# Altium PCB PB-PCB1.PcbDoc (part 1 of 4)
Units mm, origin at the board's own origin, x right, y up, seen from the top; angles counter-clockwise.
Board outline 179 x 85 mm, 2 copper layers (Top Layer, Bottom Layer); 468 components, 249 nets, 1291 pads, 562 vias.
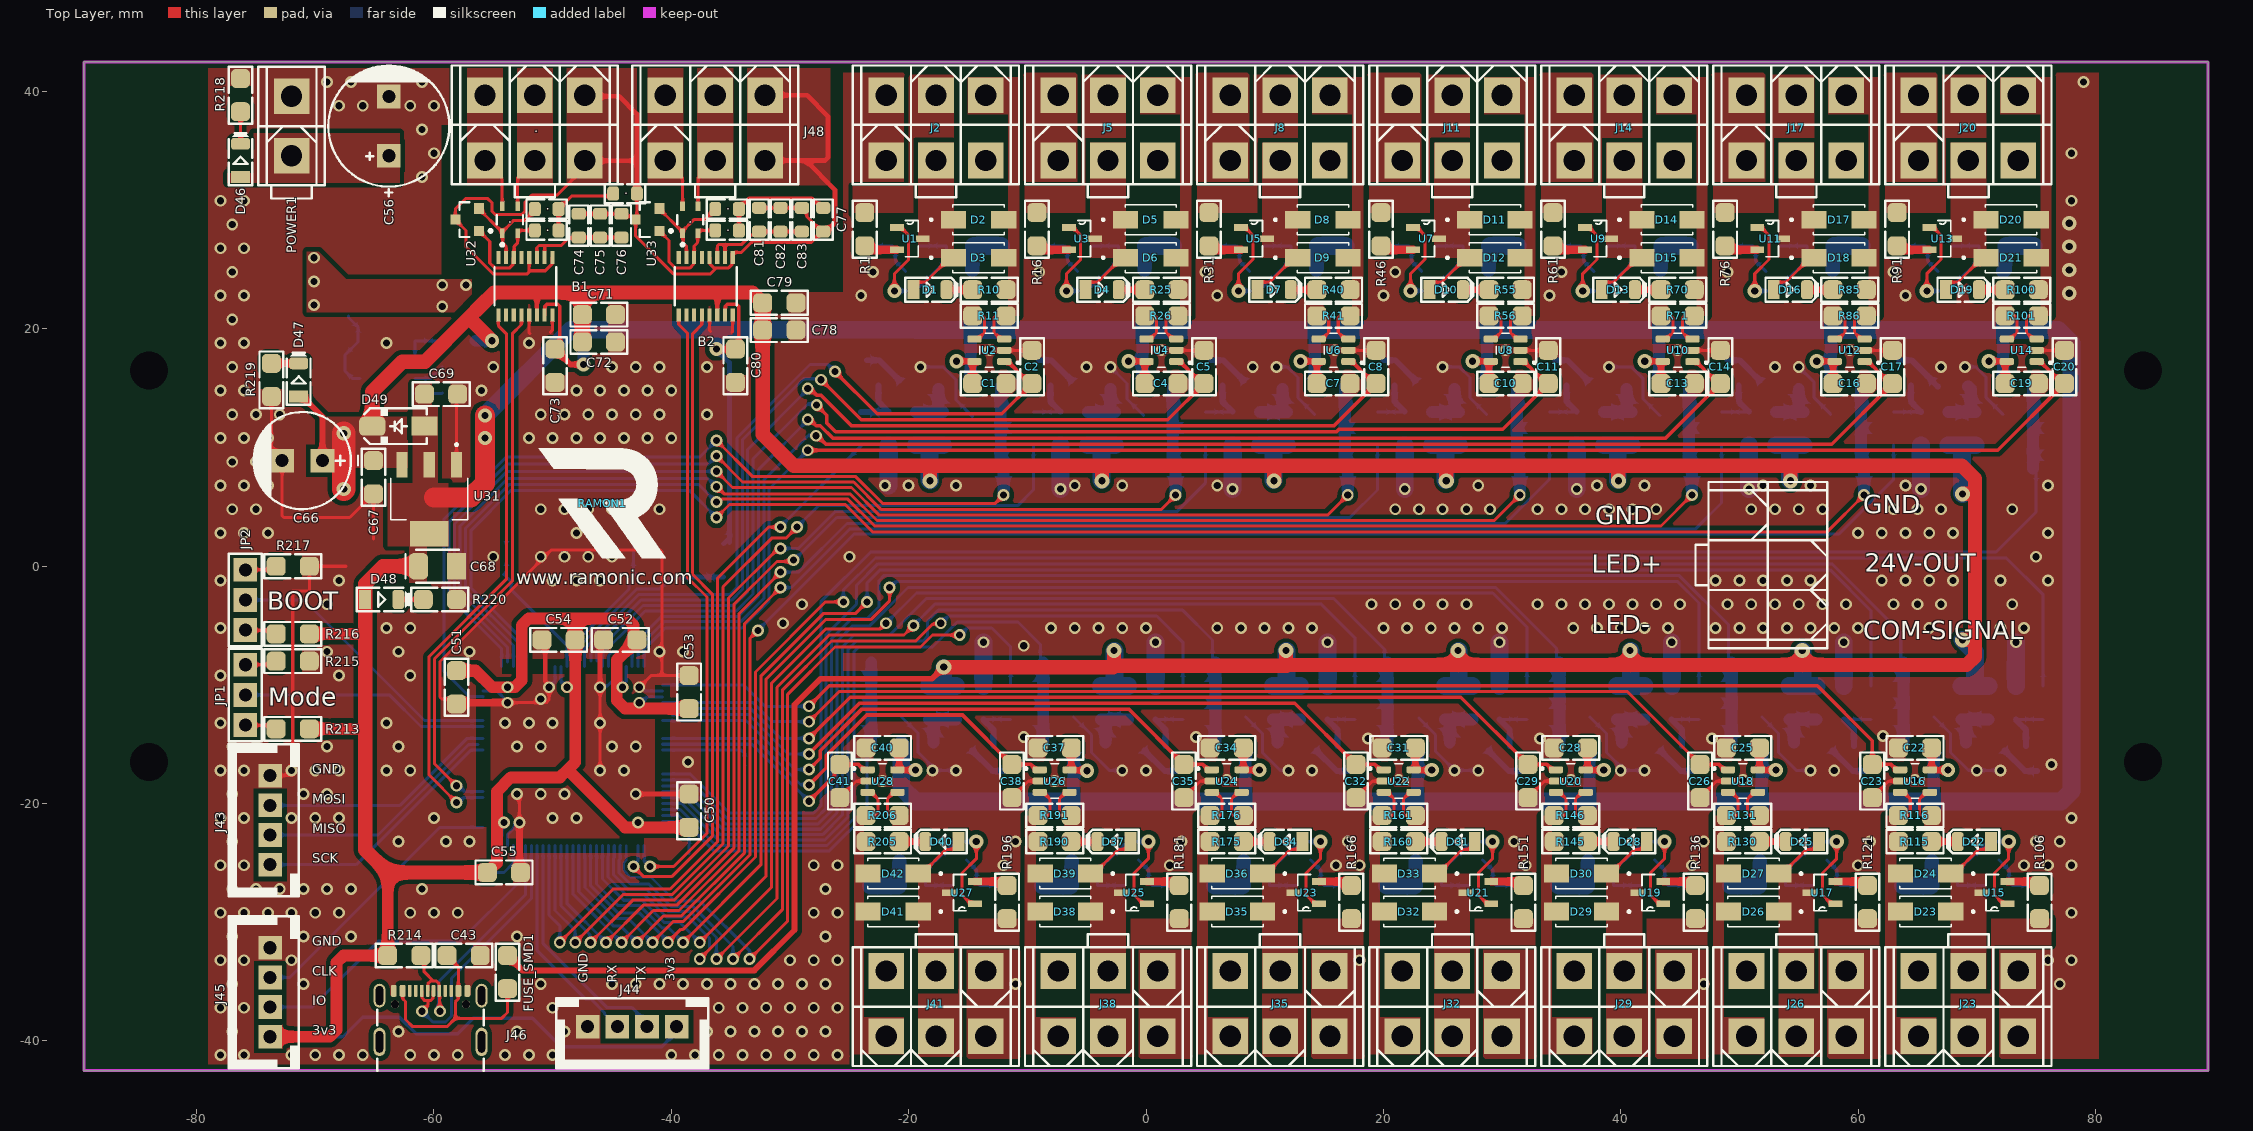
[diagram p0: Top Layer view]
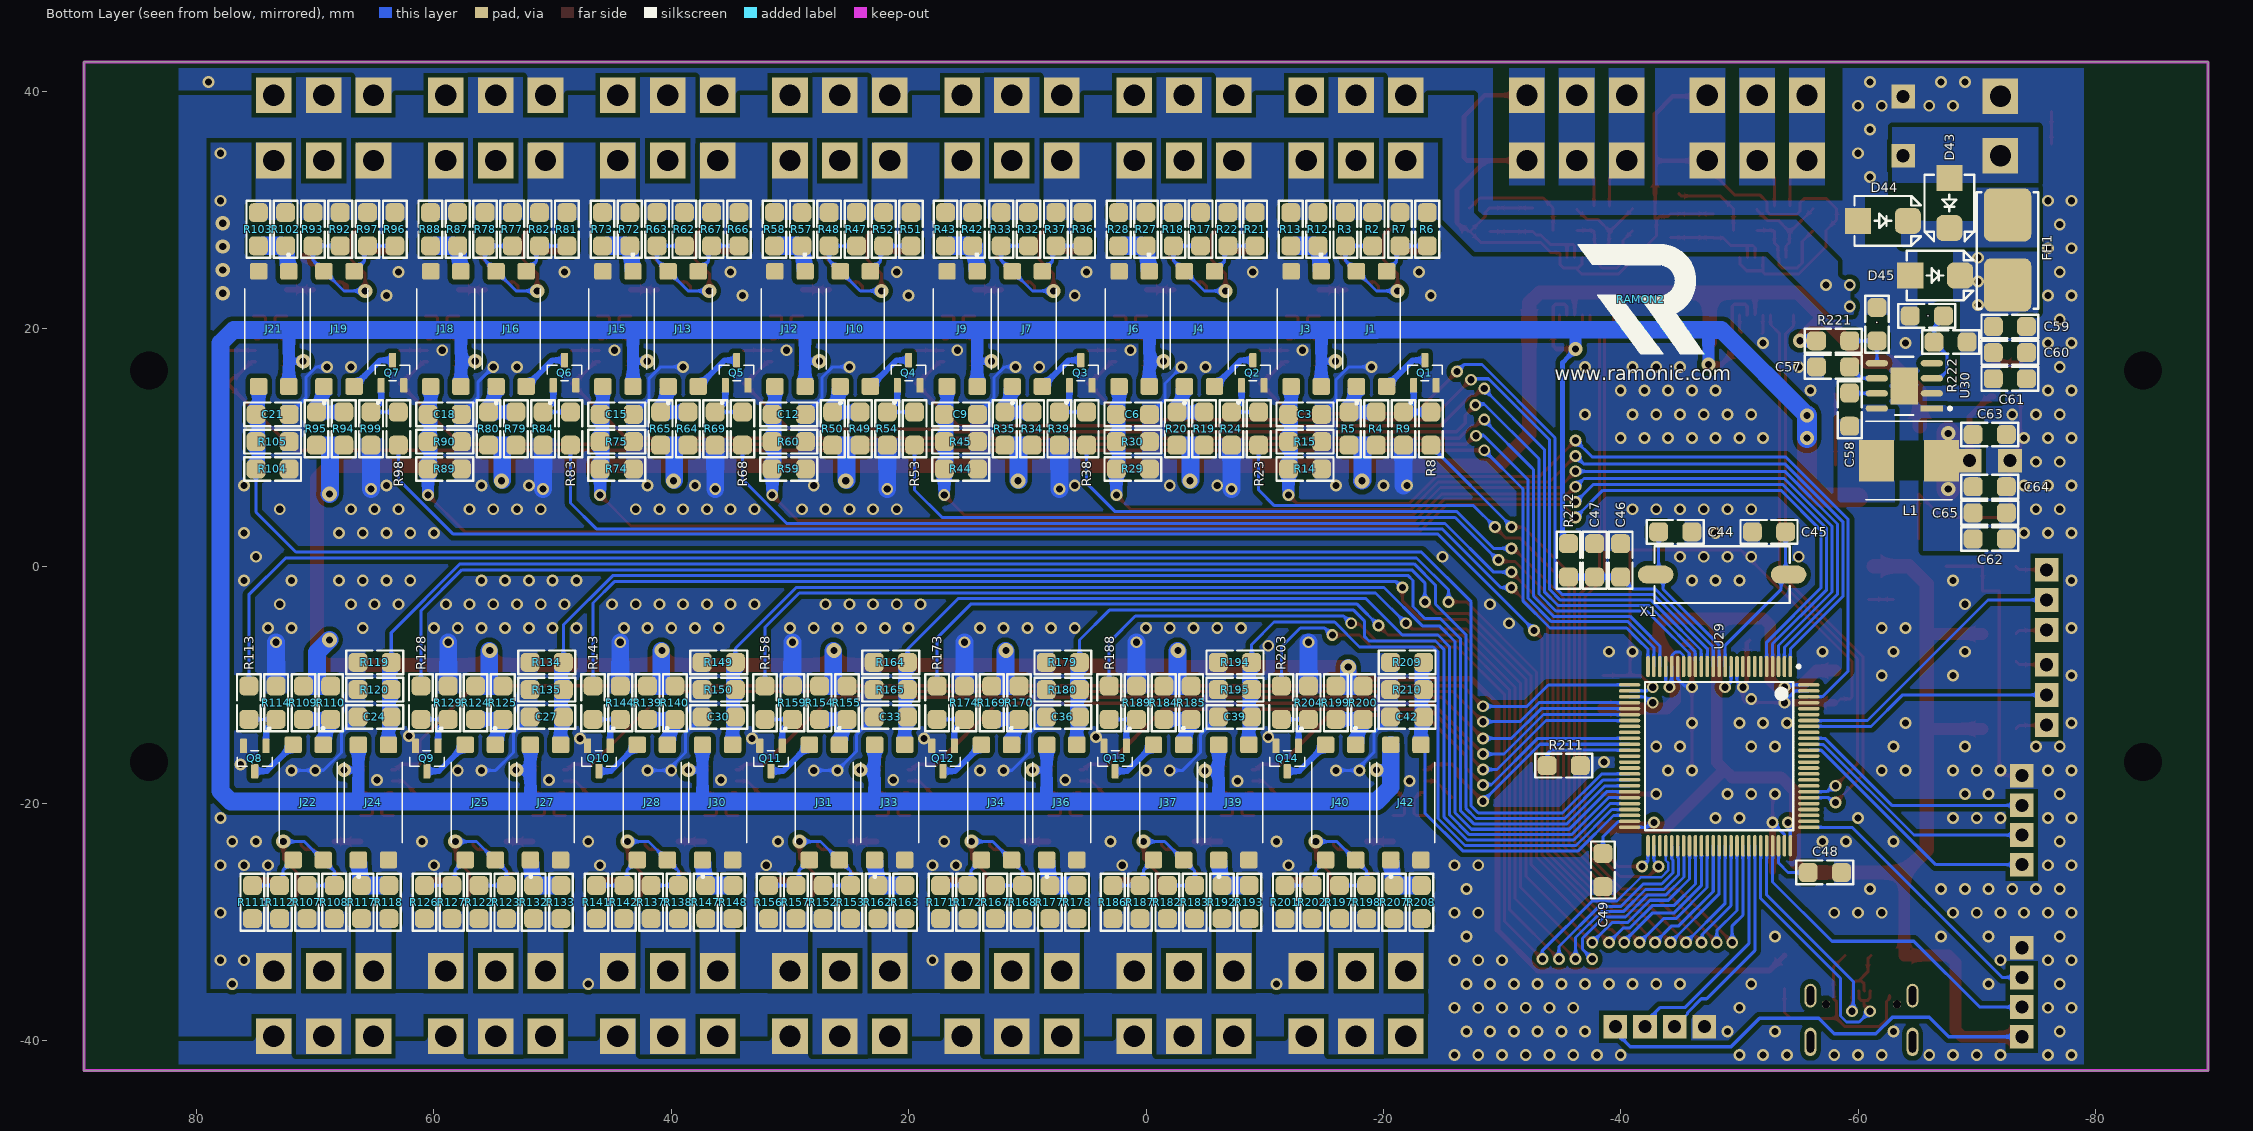
[diagram p1: Bottom Layer view, seen from below]
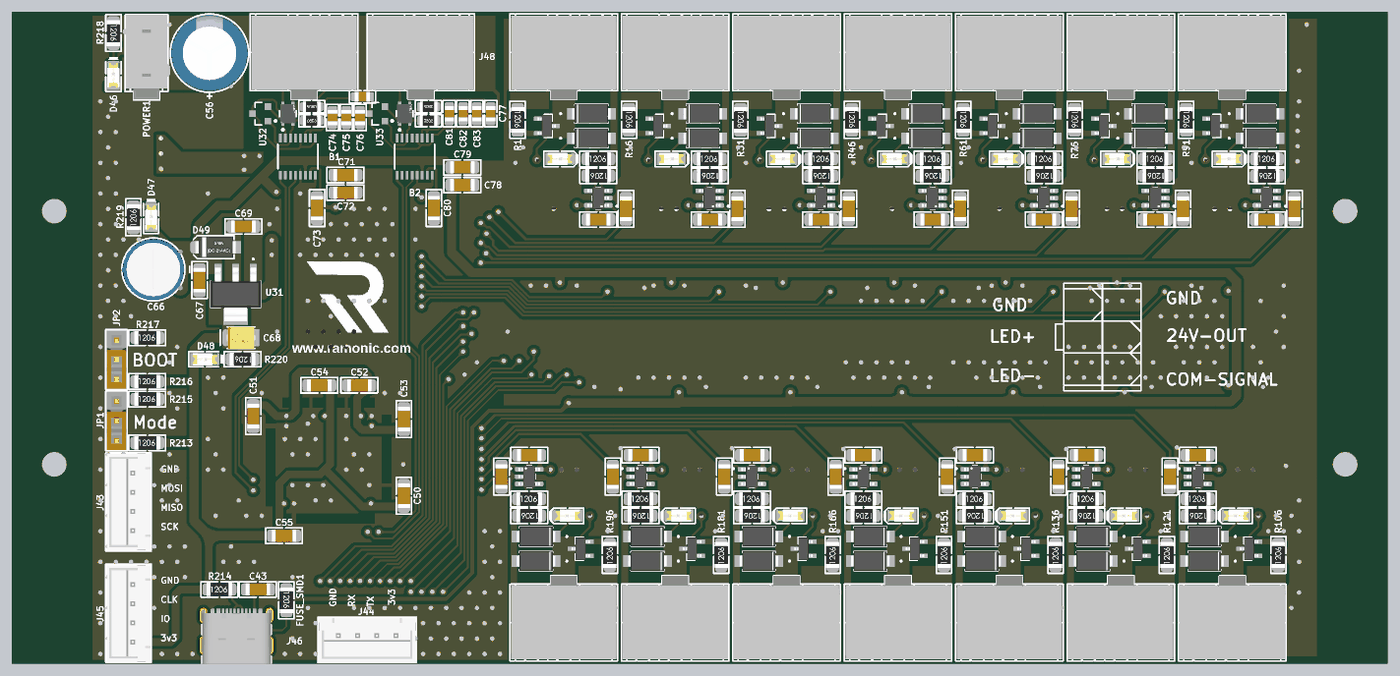
[diagram p4: 3D render of the assembled board from above, using the file's embedded part models]
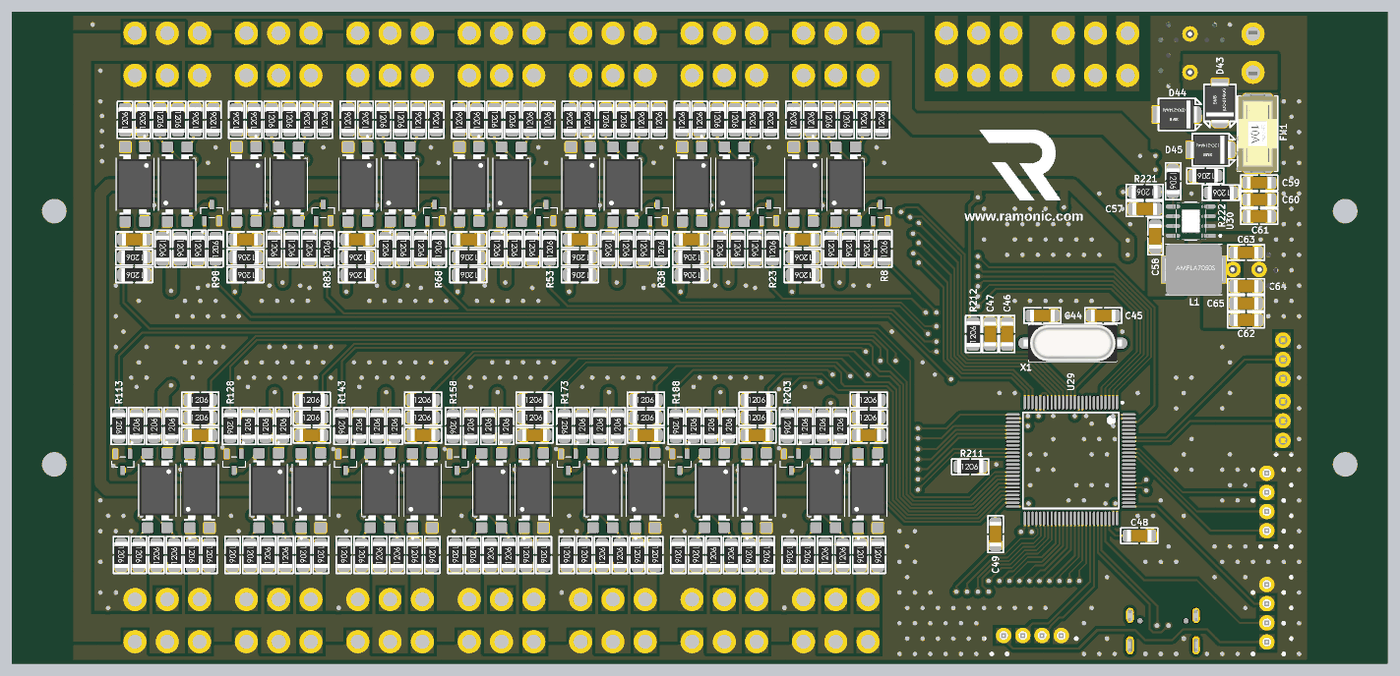
[diagram p5: 3D render of the assembled board from below, using the file's embedded part models]

## Layer stack, top to bottom
Top Solder: solder mask 0.0102, Solder Resist, Dk 3.5
Top Layer: signal copper 0.0356
Dielectric 1: dielectric 0.32, FR-4, Dk 4.8
Bottom Layer: signal copper 0.0356
Bottom Solder: solder mask 0.0102, Solder Resist, Dk 3.5

## Board outline
-89.5,-42.5 -89.5,42.5 89.5,42.5 89.5,-42.5

## Design rules (kind name [scope] priority, off if disabled: settings)
AcuteAngle [All] p1: minimum=7.50000000000000E+0001 checktracksonly=FALSE
BoardOutlineClearance [All] p1: gap=0.4 ignorepadtopadclearanceinfootprint=FALSE
Clearance [All] p1: gap=0.2 ignorepadtopadclearanceinfootprint=FALSE except(0.3: Arc-THPad Arc-Hole Track-THPad Track-Hole SMDPad-THPad SMDPad-Hole THPad-THPad THPad-Via THPad-Fill THPad-Region THPad-Hole Via-Via Via-Fill Via-Region Via-Hole Fill-Hole Region-Hole; 0.4: Arc-Poly Track-Poly SMDPad-Poly THPad-Poly Via-Poly Fill-Poly Poly-Poly Poly-Region Poly-Text Poly-Hole)
FanoutControl Fanout_Default [All] p1: bgadir=Out bgaviamode=Centered fanoutstyle=Auto fanoutdirection=Alternating viagrid=0.025 // Fanout_Default (Default Rule)
FanoutControl Fanout_Small [(CompPinCount < 5)] p2: bgadir=Out bgaviamode=Centered fanoutstyle=Auto fanoutdirection=OutThenIn viagrid=0.025 // Fanout_Small (Default Rule)
FanoutControl Fanout_LCC [IsLCC] p4: bgadir=Out bgaviamode=Centered fanoutstyle=Auto fanoutdirection=Alternating viagrid=0.025 // Fanout_LCC (Default Rule)
FanoutControl Fanout_BGA [IsBGA] p5: bgadir=Out bgaviamode=Centered fanoutstyle=Auto fanoutdirection=Alternating viagrid=0.025 // Fanout_BGA (Default Rule)
HoleSize [All] p1: absolutevalues=TRUE maxlimit=50 minlimit=0.4 maxpercent=80.000 minpercent=20.000
HoleToHoleClearance [All] p1: gap=0.3 allowstackedmicrovias=TRUE
MinimumAnnularRing [All] p1: minimumring=0.2
MinimumSolderMaskSliver [All] p1: minsoldermaskwidth=0.2
PolygonConnect [All] p1: connectstyle=Direct reliefconductorwidth=0.254 reliefentries=4 polygonreliefangle="90 Angle" airgapwidth=0.254
RoutingVias [All] p1: holewidth=0.5 width=0.9 viastyle="Through Hole" minholewidth=0.4 minwidth=0.8 maxholewidth=2 maxwidth=3
SilkToSolderMaskClearance [IsPad] p1: minsilkscreentomaskgap=0.2 clearancetoexposedcopper=TRUE
SolderMaskExpansion [All] p1: expansion=0.102 istentingtop=FALSE
SupplyNets "Schematic Supply Nets_1" [InNet('MGND')] p1: voltage=0.000
SupplyNets "Schematic Supply Nets" [InNet('MCUGND')] p2: voltage=0.000
Width [All] p1: maxlimit=10 minlimit=0.2 preferedwidth=0.254
22 further rules are at their usual default settings.

## Classes and differential pairs
component class CAN: . B1 B2 C71 C72 C73 C74 C75 C76 C77 C78 C79 C80 C81 C82 C83 J48 U32 U33
component class power: . C56 C57 C58 C59 C60 C61 C62 C63 C64 C65 C66 C67 C68 C69 D43 D44 D45 D46 D47 D48 D49 FH1 L1 POWER1 R218 R219 R220 R221 R222 U30 U31
component class MCU: C43 C44 C45 C46 C47 C48 C49 C50 C51 C52 C53 C54 C55 FUSE_SMD1 J43 J44 J45 J46 JP1 JP2 R211 R212 R213 R214 R215 R216 R217 RAMON1 RAMON2 U29 X1
component class push-button-switch-14: C40 C41 C42 D40 D41 D42 J40 J41 J42 Q14 R196 R197 R198 R199 R200 R201 R202 R203 R204 R205 R206 R207 R208 R209 R210 U27 U28
component class push-button-switch-13: C37 C38 C39 D37 D38 D39 J37 J38 J39 Q13 R181 R182 R183 R184 R185 R186 R187 R188 R189 R190 R191 R192 R193 R194 R195 U25 U26
component class push-button-switch-12: C34 C35 C36 D34 D35 D36 J34 J35 J36 Q12 R166 R167 R168 R169 R170 R171 R172 R173 R174 R175 R176 R177 R178 R179 R180 U23 U24
component class push-button-switch-11: C31 C32 C33 D31 D32 D33 J31 J32 J33 Q11 R151 R152 R153 R154 R155 R156 R157 R158 R159 R160 R161 R162 R163 R164 R165 U21 U22
component class push-button-switch-10: C28 C29 C30 D28 D29 D30 J28 J29 J30 Q10 R136 R137 R138 R139 R140 R141 R142 R143 R144 R145 R146 R147 R148 R149 R150 U19 U20
component class push-button-switch-9: C25 C26 C27 D25 D26 D27 J25 J26 J27 Q9 R121 R122 R123 R124 R125 R126 R127 R128 R129 R130 R131 R132 R133 R134 R135 U17 U18
component class push-button-switch-8: C22 C23 C24 D22 D23 D24 J22 J23 J24 Q8 R106 R107 R108 R109 R110 R111 R112 R113 R114 R115 R116 R117 R118 R119 R120 U15 U16
component class push-button-switch-7: C19 C20 C21 D19 D20 D21 J19 J20 J21 Q7 R91 R92 R93 R94 R95 R96 R97 R98 R99 R100 R101 R102 R103 R104 R105 U13 U14
component class push-button-switch-6: C16 C17 C18 D16 D17 D18 J16 J17 J18 Q6 R76 R77 R78 R79 R80 R81 R82 R83 R84 R85 R86 R87 R88 R89 R90 U11 U12
component class push-button-switch-5: C13 C14 C15 D13 D14 D15 J13 J14 J15 Q5 R61 R62 R63 R64 R65 R66 R67 R68 R69 R70 R71 R72 R73 R74 R75 U9 U10
component class push-button-switch-4: C10 C11 C12 D10 D11 D12 J10 J11 J12 Q4 R46 R47 R48 R49 R50 R51 R52 R53 R54 R55 R56 R57 R58 R59 R60 U7 U8
component class push-button-switch-3: C7 C8 C9 D7 D8 D9 J7 J8 J9 Q3 R31 R32 R33 R34 R35 R36 R37 R38 R39 R40 R41 R42 R43 R44 R45 U5 U6
component class push-button-switch-2: C4 C5 C6 D4 D5 D6 J4 J5 J6 Q2 R16 R17 R18 R19 R20 R21 R22 R23 R24 R25 R26 R27 R28 R29 R30 U3 U4
component class push-button-switch-1: C1 C2 C3 D1 D2 D3 J1 J2 J3 Q1 R1 R2 R3 R4 R5 R6 R7 R8 R9 R10 R11 R12 R13 R14 R15 U1 U2

## Components (designator, comment, footprint, x,y, rotation, side; value= is the part's Value field where it differs from the comment)
. "CONN_ATXPWR_6" ATXPWR_6 -51.5,37.191 r0 top (schematic designator J47)
. "ACM2520-102-2P-T002" FP-ACM2520-2P-MFG -38.4,29.2 r90 top (schematic designator L3)
. "ACM2520-102-2P-T002" FP-ACM2520-2P-MFG -53.6,29.2 r90 top (schematic designator L2)
. "RES1206 60 1%" R0805 -35.3,28.3 r0 top (schematic designator R228)
. "RES1206 60 1%" R0805 -35.3,30.1 r180 top (schematic designator R227)
. "RES1206 60 1%" R0805 -50.5,28.3 r0 top (schematic designator R226)
. "RES1206 60 1%" R0805 -50.5,30.1 r180 top (schematic designator R225)
. "CAP0805 4.7nf 50V" C0805 -43.9,31.4 r0 top (schematic designator C70)
. "RES1206 24.9k 1%" R1206#1 -61.6,20.4 r270 bottom (schematic designator R223)
. "RES1206 10K 1%" R1206#1 -65.8,21.1 r0 bottom (schematic designator R224)
B1 "CA-IS2062A" CAIS2062A -52.3,23.6 r90 top
B2 "CA-IS2062A" CAIS2062A -37.1,23.6 r90 top
C1 "CAP1206 100nf 50V" C1206#1 -13.2,15.4 r180 top locked
C2 "CAP1206 100nf 50V" C1206#1 -9.6,16.8 r90 top locked
C3 "CAP1206 100nf 50V" C1206#2 -13.4,12.8 r180 bottom locked
C4 "CAP1206 100nf 50V" C1206#1 1.3,15.4 r180 top locked
C5 "CAP1206 100nf 50V" C1206#1 4.9,16.8 r90 top locked
C6 "CAP1206 100nf 50V" C1206#2 1.1,12.8 r180 bottom locked
C7 "CAP1206 100nf 50V" C1206#1 15.8,15.4 r180 top locked
C8 "CAP1206 100nf 50V" C1206#1 19.4,16.8 r90 top locked
C9 "CAP1206 100nf 50V" C1206#2 15.6,12.8 r180 bottom locked
C10 "CAP1206 100nf 50V" C1206#1 30.3,15.4 r180 top locked
C11 "CAP1206 100nf 50V" C1206#1 33.9,16.8 r90 top locked
C12 "CAP1206 100nf 50V" C1206#2 30.1,12.8 r180 bottom locked
C13 "CAP1206 100nf 50V" C1206#1 44.8,15.4 r180 top locked
C14 "CAP1206 100nf 50V" C1206#1 48.4,16.8 r90 top locked
C15 "CAP1206 100nf 50V" C1206#2 44.6,12.8 r180 bottom locked
C16 "CAP1206 100nf 50V" C1206#1 59.3,15.4 r180 top locked
C17 "CAP1206 100nf 50V" C1206#1 62.9,16.8 r90 top locked
C18 "CAP1206 100nf 50V" C1206#2 59.1,12.8 r180 bottom locked
C19 "CAP1206 100nf 50V" C1206#1 73.8,15.4 r180 top locked
C20 "CAP1206 100nf 50V" C1206#1 77.4,16.8 r90 top locked
C21 "CAP1206 100nf 50V" C1206#2 73.6,12.8 r180 bottom locked
C22 "CAP1206 100nf 50V" C1206#1 64.8,-15.3 r0 top locked
C23 "CAP1206 100nf 50V" C1206#1 61.2,-18.1 r270 top locked
C24 "CAP1206 100nf 50V" C1206#2 65,-12.7 r0 bottom locked
C25 "CAP1206 100nf 50V" C1206#1 50.3,-15.3 r0 top locked
C26 "CAP1206 100nf 50V" C1206#1 46.7,-18.1 r270 top locked
C27 "CAP1206 100nf 50V" C1206#2 50.5,-12.7 r0 bottom locked
C28 "CAP1206 100nf 50V" C1206#1 35.8,-15.3 r0 top locked
C29 "CAP1206 100nf 50V" C1206#1 32.2,-18.1 r270 top locked
C30 "CAP1206 100nf 50V" C1206#2 36,-12.7 r0 bottom locked
C31 "CAP1206 100nf 50V" C1206#1 21.3,-15.3 r0 top locked
C32 "CAP1206 100nf 50V" C1206#1 17.7,-18.1 r270 top locked
C33 "CAP1206 100nf 50V" C1206#2 21.5,-12.7 r0 bottom locked
C34 "CAP1206 100nf 50V" C1206#1 6.8,-15.3 r0 top locked
C35 "CAP1206 100nf 50V" C1206#1 3.2,-18.1 r270 top locked
C36 "CAP1206 100nf 50V" C1206#2 7,-12.7 r0 bottom locked
C37 "CAP1206 100nf 50V" C1206#1 -7.7,-15.3 r0 top locked
C38 "CAP1206 100nf 50V" C1206#1 -11.3,-18.1 r270 top locked
C39 "CAP1206 100nf 50V" C1206#2 -7.5,-12.7 r0 bottom locked
C40 "CAP1206 100nf 50V" C1206#1 -22.2,-15.3 r0 top locked
C41 "CAP1206 100nf 50V" C1206#1 -25.8,-18.1 r270 top locked
C42 "CAP1206 100nf 50V" C1206#2 -22,-12.7 r0 bottom
C43 "CAP1206 100nf 50V" C1206#1 -57.5,-32.8 r180 top locked
C44 "CAP1206 22pf 50V" C1206#2 -44.6,2.9 r0 bottom locked
C45 "CAP1206 22pf 50V" C1206#2 -52.5,2.9 r180 bottom locked
C46 "CAP1206 1uf 50V" C1206#2 -40,0.5 r270 bottom
C47 "CAP1206 100nf 50V" C1206#2 -37.8,0.5 r270 bottom
C48 "CAP1206 2.2uf 50V" C1206#2 -57.2,-25.8 r0 bottom locked
C49 "CAP1206 2.2uf 50V" C1206#2 -38.5,-25.6 r90 bottom locked
C50 "CAP1206 100nf 50V" C1206#1 -38.5,-20.6 r270 top locked
C51 "CAP1206 100nf 50V" C1206#1 -58.1,-10.2 r90 top locked
C52 "CAP1206 100nf 50V" C1206#1 -44.3,-6.2 r0 top locked
C53 "CAP1206 100nf 50V" C1206#1 -38.5,-10.6 r270 top locked
C54 "CAP1206 100nf 50V" C1206#1 -49.5,-6.2 r0 top locked
C55 "CAP1206 100nf 50V" C1206#1 -54.1,-25.8 r180 top locked
C56 "HT1V477M1012PC" C_EL_10X16 -63.8,37.091 r90 top value=470uF
C57 "CAP1206 1uf 50V" C1206#2 -57.9,16.8 r0 bottom
C58 "CAP1206 100nf 50V" C1206#2 -59.3,13.2 r270 bottom
C59 "CAP1206 10uf 50V" C1206#2 -72.8,20.2 r180 bottom
C60 "CAP1206 10uf 50V" C1206#2 -72.8,18 r180 bottom
C61 "CAP1206 220nf 50V" C1206#2 -72.8,15.8 r180 bottom
C62 "CAP1206 10uf 50V" C1206#2 -71.1,2.3 r180 bottom
C63 "CAP1206 10uf 50V" C1206#2 -71.1,11.1 r180 bottom
C64 "CAP1206 10uf 50V" C1206#2 -71.1,6.7 r180 bottom
C65 "CAP1206 10uf 50V" C1206#2 -71.1,4.5 r180 bottom
C66 "100uF" C_EL_8X12 -71.1,8.9 r180 top
C67 "CAP1206 1uf 50V" C1206#1 -65.1,7.5 r270 top
C68 "47uF" C_TN_3528 -59.7,0 r0 top
C69 "CAP1206 2.2uf 50V" C1206#1 -59.4,14.5 r0 top
C71 "CAP1206 10uf 50V" C1206#1 -46.1,21.2 r180 top
C72 "CAP1206 100nf 50V" C1206#1 -46.1,18.9 r180 top
C73 "CAP1206 100nf 50V" C1206#1 -49.8,16.9 r270 top
C74 "CAP0805 100nf 50V" C0805 -47.8,28.7 r270 top
C75 "CAP0805 100nf 50V" C0805 -46,28.7 r270 top
C76 "CAP0805 100nf 50V" C0805 -44.2,28.7 r270 top
C77 "CAP0805 4.7nf 50V" C0805 -27.2,29.2 r270 top
C78 "CAP1206 10uf 50V" C1206#1 -30.9,19.9 r180 top
C79 "CAP1206 100nf 50V" C1206#1 -30.9,22.2 r180 top
C80 "CAP1206 100nf 50V" C1206#1 -34.6,16.9 r270 top
C81 "CAP0805 100nf 50V" C0805 -32.6,29.2 r270 top
C82 "CAP0805 100nf 50V" C0805 -30.8,29.2 r270 top
C83 "CAP0805 100nf 50V" C0805 -29,29.2 r270 top
D1 "LED1206GRN" LED1206GRN#1 -18.2,23.3 r0 top locked
D2 "SS16" DIOM4325X250N -14.1,29.2 r0 top locked
D3 "SS16" DIOM4325X250N -14.1,26 r0 top locked
D4 "LED1206GRN" LED1206GRN#1 -3.7,23.3 r0 top locked
D5 "SS16" DIOM4325X250N 0.4,29.2 r0 top locked
D6 "SS16" DIOM4325X250N 0.4,26 r0 top locked
D7 "LED1206GRN" LED1206GRN#1 10.8,23.3 r0 top locked
D8 "SS16" DIOM4325X250N 14.9,29.2 r0 top locked
D9 "SS16" DIOM4325X250N 14.9,26 r0 top locked
D10 "LED1206GRN" LED1206GRN#1 25.3,23.3 r0 top locked
D11 "SS16" DIOM4325X250N 29.4,29.2 r0 top locked
D12 "SS16" DIOM4325X250N 29.4,26 r0 top locked
D13 "LED1206GRN" LED1206GRN#1 39.8,23.3 r0 top locked
D14 "SS16" DIOM4325X250N 43.9,29.2 r0 top locked
D15 "SS16" DIOM4325X250N 43.9,26 r0 top locked
D16 "LED1206GRN" LED1206GRN#1 54.3,23.3 r0 top locked
D17 "SS16" DIOM4325X250N 58.4,29.2 r0 top locked
D18 "SS16" DIOM4325X250N 58.4,26 r0 top locked
D19 "LED1206GRN" LED1206GRN#2 68.8,23.3 r0 top locked
D20 "SS16" DIOM4325X250N 72.9,29.2 r0 top locked
D21 "SS16" DIOM4325X250N 72.9,26 r0 top locked
D22 "LED1206GRN" LED1206GRN#1 69.8,-23.2 r180 top locked
D23 "SS16" DIOM4325X250N 65.7,-29.1 r180 top locked
D24 "SS16" DIOM4325X250N 65.7,-25.9 r180 top locked
D25 "LED1206GRN" LED1206GRN#1 55.3,-23.2 r180 top locked
D26 "SS16" DIOM4325X250N 51.2,-29.1 r180 top locked
D27 "SS16" DIOM4325X250N 51.2,-25.9 r180 top locked
D28 "LED1206GRN" LED1206GRN#1 40.8,-23.2 r180 top locked
D29 "SS16" DIOM4325X250N 36.7,-29.1 r180 top locked
D30 "SS16" DIOM4325X250N 36.7,-25.9 r180 top locked
D31 "LED1206GRN" LED1206GRN#1 26.3,-23.2 r180 top locked
D32 "SS16" DIOM4325X250N 22.2,-29.1 r180 top locked
D33 "SS16" DIOM4325X250N 22.2,-25.9 r180 top locked
D34 "LED1206GRN" LED1206GRN#1 11.8,-23.2 r180 top locked
D35 "SS16" DIOM4325X250N 7.7,-29.1 r180 top locked
D36 "SS16" DIOM4325X250N 7.7,-25.9 r180 top locked
D37 "LED1206GRN" LED1206GRN#1 -2.7,-23.2 r180 top locked
D38 "SS16" DIOM4325X250N -6.8,-29.1 r180 top locked
D39 "SS16" DIOM4325X250N -6.8,-25.9 r180 top locked
D40 "LED1206GRN" LED1206GRN#1 -17.2,-23.2 r180 top locked
D41 "SS16" DIOM4325X250N -21.3,-29.1 r180 top locked
D42 "SS16" DIOM4325X250N -21.3,-25.9 r180 top locked
D43 "SS34" D_SMB -67.7,30.6 r270 bottom
D44 "SS34" D_SMB -62.1,29.1 r180 bottom
D45 "SMBJ24CA" D_SMB -66.5,24.5 r180 bottom
D46 "LED1206GRN" LED1206GRN#1 -76.3,34.2 r90 top
D47 "LED1206GRN" LED1206GRN#1 -71.4,15.7 r90 top
D48 "LED1206GRN" LED1206GRN#1 -64.4,-2.8 r0 top
D49 "ss14" D_SMA -63,11.8 r180 top
FH1 "xf-155" FH_24101812 -72.6,26.6 r270 bottom value="Fuse Holder"
FUSE_SMD1 "FUSE1206" R1206#2 -53.8,-34.2 r270 top locked
J1 "EL817S" SOIC254P1030X460-4N -19,20 r90 bottom locked
J2 "CONN_ATXPWR_6" ATXPWR_6 -17.7,37.191 r0 top locked
J3 "EL817S" SOIC254P1030X460-4N -13.5,20 r270 bottom locked
J4 "EL817S" SOIC254P1030X460-4N -4.5,20 r90 bottom locked
J5 "CONN_ATXPWR_6" ATXPWR_6 -3.2,37.191 r0 top locked
J6 "EL817S" SOIC254P1030X460-4N 1,20 r270 bottom locked
J7 "EL817S" SOIC254P1030X460-4N 10,20 r90 bottom locked
J8 "CONN_ATXPWR_6" ATXPWR_6 11.3,37.191 r0 top locked
J9 "EL817S" SOIC254P1030X460-4N 15.5,20 r270 bottom locked
J10 "EL817S" SOIC254P1030X460-4N 24.5,20 r90 bottom locked
J11 "CONN_ATXPWR_6" ATXPWR_6 25.8,37.191 r0 top locked
J12 "EL817S" SOIC254P1030X460-4N 30,20 r270 bottom locked
J13 "EL817S" SOIC254P1030X460-4N 39,20 r90 bottom locked
J14 "CONN_ATXPWR_6" ATXPWR_6 40.3,37.191 r0 top locked
J15 "EL817S" SOIC254P1030X460-4N 44.5,20 r270 bottom locked
J16 "EL817S" SOIC254P1030X460-4N 53.5,20 r90 bottom locked
J17 "CONN_ATXPWR_6" ATXPWR_6 54.8,37.191 r0 top locked
J18 "EL817S" SOIC254P1030X460-4N 59,20 r270 bottom locked
J19 "EL817S" SOIC254P1030X460-4N 68,20 r90 bottom locked
J20 "CONN_ATXPWR_6" ATXPWR_6 69.3,37.191 r0 top locked
J21 "EL817S" SOIC254P1030X460-4N 73.5,20 r270 bottom locked
J22 "EL817S" SOIC254P1030X460-4N 70.6,-19.9 r270 bottom locked
J23 "CONN_ATXPWR_6" ATXPWR_6 69.3,-37.109 r180 top locked
J24 "EL817S" SOIC254P1030X460-4N 65.1,-19.9 r90 bottom locked
J25 "EL817S" SOIC254P1030X460-4N 56.1,-19.9 r270 bottom locked
J26 "CONN_ATXPWR_6" ATXPWR_6 54.8,-37.109 r180 top locked
J27 "EL817S" SOIC254P1030X460-4N 50.6,-19.9 r90 bottom locked
J28 "EL817S" SOIC254P1030X460-4N 41.6,-19.9 r270 bottom locked
J29 "CONN_ATXPWR_6" ATXPWR_6 40.3,-37.109 r180 top locked
J30 "EL817S" SOIC254P1030X460-4N 36.1,-19.9 r90 bottom locked
J31 "EL817S" SOIC254P1030X460-4N 27.1,-19.9 r270 bottom locked
J32 "CONN_ATXPWR_6" ATXPWR_6 25.8,-37.109 r180 top locked
J33 "EL817S" SOIC254P1030X460-4N 21.6,-19.9 r90 bottom locked
J34 "EL817S" SOIC254P1030X460-4N 12.6,-19.9 r270 bottom locked
J35 "CONN_ATXPWR_6" ATXPWR_6 11.3,-37.109 r180 top locked
J36 "EL817S" SOIC254P1030X460-4N 7.1,-19.9 r90 bottom locked
J37 "EL817S" SOIC254P1030X460-4N -1.9,-19.9 r270 bottom locked
J38 "CONN_ATXPWR_6" ATXPWR_6 -3.2,-37.109 r180 top locked
J39 "EL817S" SOIC254P1030X460-4N -7.4,-19.9 r90 bottom locked
J40 "EL817S" SOIC254P1030X460-4N -16.4,-19.9 r270 bottom locked
J41 "CONN_ATXPWR_6" ATXPWR_6 -17.7,-37.109 r180 top locked
J42 "EL817S" SOIC254P1030X460-4N -21.9,-19.9 r90 bottom locked
J43 "XH_4" XH_4 -73.8,-21.4 r90 top locked
J44 "XH_4" XH_4 -43.3,-38.8 r180 top locked
J45 "XH_4" XH_4 -73.8,-35.9 r90 top locked
J46 "DX07S016JA1" USBC_SMD_16_DX07S016JA1 -60.29,-35.78 r180 top locked
J48 "CONN_ATXPWR_6" ATXPWR_6 -36.3,37.191 r0 top
JP1 "JMPHDR3PIN" JPH_3 -75.9,-10.84 r90 top locked
JP2 "JMPHDR3PIN" JPH_3 -75.9,-2.84 r90 top locked
L1 "8uH-7.3mmx6.6mm" IND_AMPLA7050S-100MT -64.3,8.9 r180 bottom
POWER1 "CONN_ATXPWR_2" ATXPWR_2 -72,37.091 r0 top
Q1 "2N7002" SOT95P240X111-3N -23.5,16.3 r90 bottom locked
Q2 "2N7002" SOT95P240X111-3N -9,16.3 r90 bottom locked
Q3 "2N7002" SOT95P240X111-3N 5.5,16.3 r90 bottom locked
Q4 "2N7002" SOT95P240X111-3N 20,16.3 r90 bottom locked
Q5 "2N7002" SOT95P240X111-3N 34.5,16.3 r90 bottom locked
Q6 "2N7002" SOT95P240X111-3N 49,16.3 r90 bottom locked
Q7 "2N7002" SOT95P240X111-3N 63.5,16.3 r90 bottom locked
Q8 "2N7002" SOT95P240X111-3N 75.1,-16.2 r270 bottom locked
Q9 "2N7002" SOT95P240X111-3N 60.6,-16.2 r270 bottom locked
Q10 "2N7002" SOT95P240X111-3N 46.1,-16.2 r270 bottom locked
Q11 "2N7002" SOT95P240X111-3N 31.6,-16.2 r270 bottom locked
Q12 "2N7002" SOT95P240X111-3N 17.1,-16.2 r270 bottom locked
Q13 "2N7002" SOT95P240X111-3N 2.6,-16.2 r270 bottom locked
Q14 "2N7002" SOT95P240X111-3N -11.9,-16.2 r270 bottom locked
R1 "FUSE 1206" R1206#2 -23.7,28.4 r270 top locked
R2 "RES1206 12K 1%" R1206#1 -19.1,28.4 r270 bottom locked
R3 "RES1206 12K 1%" R1206#1 -16.8,28.4 r270 bottom locked
R4 "RES1206 1k 1%" R1206#1 -19.4,11.6 r270 bottom locked
R5 "RES1206 1k 1%" R1206#1 -17.1,11.6 r270 bottom locked
R6 "RES1206 12K 1%" R1206#1 -23.7,28.4 r90 bottom locked
R7 "RES1206 12K 1%" R1206#1 -21.4,28.4 r90 bottom locked
R8 "RES1206 100R 1%" R1206#1 -24,11.6 r90 bottom locked
R9 "RES1206 12K 1%" R1206#1 -21.7,11.6 r270 bottom locked
R10 "RES1206 12K 1%" R1206#2 -13.2,23.3 r0 top locked
R11 "RES1206 1R 1%" R1206#2 -13.2,21.1 r180 top locked
R12 "RES1206 4.7K 1%" R1206#1 -14.5,28.4 r90 bottom locked
R13 "RES1206 4.7K 1%" R1206#1 -12.2,28.4 r90 bottom locked
R14 "RES1206 4.7K 1%" R1206#1 -13.4,8.2 r0 bottom locked
R15 "RES1206 4.7K 1%" R1206#1 -13.4,10.5 r0 bottom locked
R16 "FUSE 1206" R1206#2 -9.2,28.4 r270 top locked
R17 "RES1206 12K 1%" R1206#1 -4.6,28.4 r270 bottom locked
R18 "RES1206 12K 1%" R1206#1 -2.3,28.4 r270 bottom locked
R19 "RES1206 1k 1%" R1206#1 -4.9,11.6 r270 bottom locked
R20 "RES1206 1k 1%" R1206#1 -2.6,11.6 r270 bottom locked
R21 "RES1206 12K 1%" R1206#1 -9.2,28.4 r90 bottom locked
R22 "RES1206 12K 1%" R1206#1 -6.9,28.4 r90 bottom locked
R23 "RES1206 100R 1%" R1206#1 -9.5,11.6 r90 bottom locked
R24 "RES1206 12K 1%" R1206#1 -7.2,11.6 r270 bottom locked
R25 "RES1206 12K 1%" R1206#2 1.3,23.3 r0 top locked
R26 "RES1206 1R 1%" R1206#2 1.3,21.1 r180 top locked
R27 "RES1206 4.7K 1%" R1206#1 0,28.4 r90 bottom locked
R28 "RES1206 4.7K 1%" R1206#1 2.3,28.4 r90 bottom locked
R29 "RES1206 4.7K 1%" R1206#1 1.1,8.2 r0 bottom locked
R30 "RES1206 4.7K 1%" R1206#1 1.1,10.5 r0 bottom locked
R31 "FUSE 1206" R1206#2 5.3,28.4 r270 top locked
R32 "RES1206 12K 1%" R1206#1 9.9,28.4 r270 bottom locked
R33 "RES1206 12K 1%" R1206#1 12.2,28.4 r270 bottom locked
R34 "RES1206 1k 1%" R1206#1 9.6,11.6 r270 bottom locked
R35 "RES1206 1k 1%" R1206#1 11.9,11.6 r270 bottom locked
R36 "RES1206 12K 1%" R1206#1 5.3,28.4 r90 bottom locked
R37 "RES1206 12K 1%" R1206#1 7.6,28.4 r90 bottom locked
R38 "RES1206 100R 1%" R1206#1 5,11.6 r90 bottom locked
R39 "RES1206 12K 1%" R1206#1 7.3,11.6 r270 bottom locked
R40 "RES1206 12K 1%" R1206#2 15.8,23.3 r0 top locked
R41 "RES1206 1R 1%" R1206#2 15.8,21.1 r180 top locked
R42 "RES1206 4.7K 1%" R1206#1 14.6,28.4 r90 bottom locked
R43 "RES1206 4.7K 1%" R1206#1 16.9,28.4 r90 bottom locked
R44 "RES1206 4.7K 1%" R1206#1 15.6,8.2 r0 bottom locked
R45 "RES1206 4.7K 1%" R1206#1 15.6,10.5 r0 bottom locked
R46 "FUSE 1206" R1206#2 19.8,28.4 r270 top locked
R47 "RES1206 12K 1%" R1206#1 24.4,28.4 r270 bottom locked
R48 "RES1206 12K 1%" R1206#1 26.7,28.4 r270 bottom locked
R49 "RES1206 1k 1%" R1206#1 24.1,11.6 r270 bottom locked
R50 "RES1206 1k 1%" R1206#1 26.4,11.6 r270 bottom locked
R51 "RES1206 12K 1%" R1206#1 19.8,28.4 r90 bottom locked
R52 "RES1206 12K 1%" R1206#1 22.1,28.4 r90 bottom locked
R53 "RES1206 100R 1%" R1206#1 19.5,11.6 r90 bottom locked
R54 "RES1206 12K 1%" R1206#1 21.8,11.6 r270 bottom locked
R55 "RES1206 12K 1%" R1206#2 30.3,23.3 r0 top locked
R56 "RES1206 1R 1%" R1206#2 30.3,21.1 r180 top locked
R57 "RES1206 4.7K 1%" R1206#1 29,28.4 r90 bottom locked
R58 "RES1206 4.7K 1%" R1206#1 31.3,28.4 r90 bottom locked
R59 "RES1206 4.7K 1%" R1206#1 30.1,8.2 r0 bottom locked
R60 "RES1206 4.7K 1%" R1206#1 30.1,10.5 r0 bottom locked
R61 "FUSE 1206" R1206#2 34.3,28.4 r270 top locked
R62 "RES1206 12K 1%" R1206#1 38.9,28.4 r270 bottom locked
R63 "RES1206 12K 1%" R1206#1 41.2,28.4 r270 bottom locked
R64 "RES1206 1k 1%" R1206#1 38.6,11.6 r270 bottom locked
R65 "RES1206 1k 1%" R1206#1 40.9,11.6 r270 bottom locked
R66 "RES1206 12K 1%" R1206#1 34.3,28.4 r90 bottom locked
R67 "RES1206 12K 1%" R1206#1 36.6,28.4 r90 bottom locked
R68 "RES1206 100R 1%" R1206#1 34,11.6 r90 bottom locked
R69 "RES1206 12K 1%" R1206#1 36.3,11.6 r270 bottom locked
R70 "RES1206 12K 1%" R1206#2 44.8,23.3 r0 top locked
R71 "RES1206 1R 1%" R1206#2 44.8,21.1 r180 top locked
R72 "RES1206 4.7K 1%" R1206#1 43.5,28.4 r90 bottom locked
R73 "RES1206 4.7K 1%" R1206#1 45.8,28.4 r90 bottom locked
R74 "RES1206 4.7K 1%" R1206#1 44.6,8.2 r0 bottom locked
R75 "RES1206 4.7K 1%" R1206#1 44.6,10.5 r0 bottom locked
R76 "FUSE 1206" R1206#2 48.8,28.4 r270 top locked
R77 "RES1206 12K 1%" R1206#1 53.4,28.4 r270 bottom locked
R78 "RES1206 12K 1%" R1206#1 55.7,28.4 r270 bottom locked
R79 "RES1206 1k 1%" R1206#1 53.1,11.6 r270 bottom locked
R80 "RES1206 1k 1%" R1206#1 55.4,11.6 r270 bottom locked
R81 "RES1206 12K 1%" R1206#1 48.8,28.4 r90 bottom locked
R82 "RES1206 12K 1%" R1206#1 51.1,28.4 r90 bottom locked
R83 "RES1206 100R 1%" R1206#1 48.5,11.6 r90 bottom locked
R84 "RES1206 12K 1%" R1206#1 50.8,11.6 r270 bottom locked
R85 "RES1206 12K 1%" R1206#2 59.3,23.3 r0 top locked
R86 "RES1206 1R 1%" R1206#2 59.3,21.1 r180 top locked
R87 "RES1206 4.7K 1%" R1206#1 58,28.4 r90 bottom locked
R88 "RES1206 4.7K 1%" R1206#1 60.3,28.4 r90 bottom locked
R89 "RES1206 4.7K 1%" R1206#1 59.1,8.2 r0 bottom locked
R90 "RES1206 4.7K 1%" R1206#1 59.1,10.5 r0 bottom locked
R91 "FUSE 1206" R1206#2 63.3,28.4 r270 top locked
R92 "RES1206 12K 1%" R1206#1 67.9,28.4 r270 bottom locked
R93 "RES1206 12K 1%" R1206#1 70.2,28.4 r270 bottom locked
R94 "RES1206 1k 1%" R1206#1 67.6,11.6 r270 bottom locked
R95 "RES1206 1k 1%" R1206#1 69.9,11.6 r270 bottom locked
R96 "RES1206 12K 1%" R1206#1 63.3,28.4 r90 bottom locked
R97 "RES1206 12K 1%" R1206#1 65.6,28.4 r90 bottom locked
R98 "RES1206 100R 1%" R1206#1 63,11.6 r90 bottom locked
R99 "RES1206 12K 1%" R1206#1 65.3,11.6 r270 bottom locked
R100 "RES1206 12K 1%" R1206#2 73.8,23.3 r0 top locked
R101 "RES1206 1R 1%" R1206#2 73.8,21.1 r180 top locked
R102 "RES1206 4.7K 1%" R1206#1 72.5,28.4 r90 bottom locked
R103 "RES1206 4.7K 1%" R1206#1 74.8,28.4 r90 bottom locked
R104 "RES1206 4.7K 1%" R1206#1 73.6,8.2 r0 bottom locked
R105 "RES1206 4.7K 1%" R1206#1 73.6,10.5 r0 bottom locked
R106 "FUSE 1206" R1206#2 75.3,-28.3 r90 top locked
R107 "RES1206 12K 1%" R1206#1 70.7,-28.3 r90 bottom locked
R108 "RES1206 12K 1%" R1206#1 68.4,-28.3 r90 bottom locked
R109 "RES1206 1k 1%" R1206#1 71,-11.5 r90 bottom locked
R110 "RES1206 1k 1%" R1206#1 68.7,-11.5 r90 bottom locked
R111 "RES1206 12K 1%" R1206#1 75.3,-28.3 r270 bottom
R112 "RES1206 12K 1%" R1206#1 73,-28.3 r270 bottom
R113 "RES1206 100R 1%" R1206#1 75.6,-11.5 r270 bottom locked
R114 "RES1206 12K 1%" R1206#1 73.3,-11.5 r90 bottom locked
R115 "RES1206 12K 1%" R1206#2 64.8,-23.2 r180 top locked
R116 "RES1206 1R 1%" R1206#2 64.8,-21 r0 top locked
R117 "RES1206 4.7K 1%" R1206#1 66.1,-28.3 r270 bottom locked
R118 "RES1206 4.7K 1%" R1206#1 63.8,-28.3 r270 bottom locked
R119 "RES1206 4.7K 1%" R1206#1 65,-8.1 r180 bottom locked
R120 "RES1206 4.7K 1%" R1206#1 65,-10.4 r180 bottom locked
R121 "FUSE 1206" R1206#2 60.8,-28.3 r90 top locked
R122 "RES1206 12K 1%" R1206#1 56.2,-28.3 r90 bottom locked
R123 "RES1206 12K 1%" R1206#1 53.9,-28.3 r90 bottom locked
R124 "RES1206 1k 1%" R1206#1 56.5,-11.5 r90 bottom locked
R125 "RES1206 1k 1%" R1206#1 54.2,-11.5 r90 bottom locked
R126 "RES1206 12K 1%" R1206#1 60.8,-28.3 r270 bottom
R127 "RES1206 12K 1%" R1206#1 58.5,-28.3 r270 bottom
R128 "RES1206 100R 1%" R1206#1 61.1,-11.5 r270 bottom locked
R129 "RES1206 12K 1%" R1206#1 58.8,-11.5 r90 bottom locked
R130 "RES1206 12K 1%" R1206#2 50.3,-23.2 r180 top locked
R131 "RES1206 1R 1%" R1206#2 50.3,-21 r0 top locked
R132 "RES1206 4.7K 1%" R1206#1 51.6,-28.3 r270 bottom locked
R133 "RES1206 4.7K 1%" R1206#1 49.3,-28.3 r270 bottom locked
R134 "RES1206 4.7K 1%" R1206#1 50.5,-8.1 r180 bottom locked
R135 "RES1206 4.7K 1%" R1206#1 50.5,-10.4 r180 bottom locked
R136 "FUSE 1206" R1206#2 46.3,-28.3 r90 top locked
R137 "RES1206 12K 1%" R1206#1 41.7,-28.3 r90 bottom locked
R138 "RES1206 12K 1%" R1206#1 39.4,-28.3 r90 bottom locked
R139 "RES1206 1k 1%" R1206#1 42,-11.5 r90 bottom locked
R140 "RES1206 1k 1%" R1206#1 39.7,-11.5 r90 bottom locked
R141 "RES1206 12K 1%" R1206#1 46.3,-28.3 r270 bottom
R142 "RES1206 12K 1%" R1206#1 44,-28.3 r270 bottom
R143 "RES1206 100R 1%" R1206#1 46.6,-11.5 r270 bottom locked
R144 "RES1206 12K 1%" R1206#1 44.3,-11.5 r90 bottom locked
R145 "RES1206 12K 1%" R1206#2 35.8,-23.2 r180 top locked
R146 "RES1206 1R 1%" R1206#2 35.8,-21 r0 top locked
R147 "RES1206 4.7K 1%" R1206#1 37.1,-28.3 r270 bottom locked
R148 "RES1206 4.7K 1%" R1206#1 34.8,-28.3 r270 bottom locked
R149 "RES1206 4.7K 1%" R1206#1 36,-8.1 r180 bottom locked
R150 "RES1206 4.7K 1%" R1206#1 36,-10.4 r180 bottom locked
R151 "FUSE 1206" R1206#2 31.8,-28.3 r90 top locked
R152 "RES1206 12K 1%" R1206#1 27.2,-28.3 r90 bottom locked
R153 "RES1206 12K 1%" R1206#1 24.9,-28.3 r90 bottom locked
R154 "RES1206 1k 1%" R1206#1 27.5,-11.5 r90 bottom locked
R155 "RES1206 1k 1%" R1206#1 25.2,-11.5 r90 bottom locked
R156 "RES1206 12K 1%" R1206#1 31.8,-28.3 r270 bottom
R157 "RES1206 12K 1%" R1206#1 29.5,-28.3 r270 bottom
R158 "RES1206 100R 1%" R1206#1 32.1,-11.5 r270 bottom locked
R159 "RES1206 12K 1%" R1206#1 29.8,-11.5 r90 bottom locked
R160 "RES1206 12K 1%" R1206#2 21.3,-23.2 r180 top locked
R161 "RES1206 1R 1%" R1206#2 21.3,-21 r0 top locked
R162 "RES1206 4.7K 1%" R1206#1 22.6,-28.3 r270 bottom locked
R163 "RES1206 4.7K 1%" R1206#1 20.3,-28.3 r270 bottom locked
R164 "RES1206 4.7K 1%" R1206#1 21.5,-8.1 r180 bottom locked
R165 "RES1206 4.7K 1%" R1206#1 21.5,-10.4 r180 bottom locked
R166 "FUSE 1206" R1206#2 17.3,-28.3 r90 top locked
R167 "RES1206 12K 1%" R1206#1 12.7,-28.3 r90 bottom locked
R168 "RES1206 12K 1%" R1206#1 10.4,-28.3 r90 bottom locked
R169 "RES1206 1k 1%" R1206#1 13,-11.5 r90 bottom locked
R170 "RES1206 1k 1%" R1206#1 10.7,-11.5 r90 bottom locked
R171 "RES1206 12K 1%" R1206#1 17.3,-28.3 r270 bottom
R172 "RES1206 12K 1%" R1206#1 15,-28.3 r270 bottom
R173 "RES1206 100R 1%" R1206#1 17.6,-11.5 r270 bottom locked
R174 "RES1206 12K 1%" R1206#1 15.3,-11.5 r90 bottom locked
R175 "RES1206 12K 1%" R1206#2 6.8,-23.2 r180 top locked
R176 "RES1206 1R 1%" R1206#2 6.8,-21 r0 top locked
R177 "RES1206 4.7K 1%" R1206#1 8.1,-28.3 r270 bottom locked
R178 "RES1206 4.7K 1%" R1206#1 5.8,-28.3 r270 bottom locked
R179 "RES1206 4.7K 1%" R1206#1 7,-8.1 r180 bottom locked
R180 "RES1206 4.7K 1%" R1206#1 7,-10.4 r180 bottom locked
R181 "FUSE 1206" R1206#2 2.8,-28.3 r90 top locked
R182 "RES1206 12K 1%" R1206#1 -1.8,-28.3 r90 bottom locked
R183 "RES1206 12K 1%" R1206#1 -4.1,-28.3 r90 bottom locked
R184 "RES1206 1k 1%" R1206#1 -1.5,-11.5 r90 bottom locked
R185 "RES1206 1k 1%" R1206#1 -3.8,-11.5 r90 bottom locked
R186 "RES1206 12K 1%" R1206#1 2.8,-28.3 r270 bottom
R187 "RES1206 12K 1%" R1206#1 0.5,-28.3 r270 bottom
R188 "RES1206 100R 1%" R1206#1 3.1,-11.5 r270 bottom locked
R189 "RES1206 12K 1%" R1206#1 0.8,-11.5 r90 bottom locked
R190 "RES1206 12K 1%" R1206#2 -7.7,-23.2 r180 top locked
R191 "RES1206 1R 1%" R1206#2 -7.7,-21 r0 top locked
R192 "RES1206 4.7K 1%" R1206#1 -6.4,-28.3 r270 bottom locked
R193 "RES1206 4.7K 1%" R1206#1 -8.7,-28.3 r270 bottom locked
R194 "RES1206 4.7K 1%" R1206#1 -7.5,-8.1 r180 bottom locked
R195 "RES1206 4.7K 1%" R1206#1 -7.5,-10.4 r180 bottom locked
R196 "FUSE 1206" R1206#2 -11.7,-28.3 r90 top locked
R197 "RES1206 12K 1%" R1206#1 -16.3,-28.3 r90 bottom locked
R198 "RES1206 12K 1%" R1206#1 -18.6,-28.3 r90 bottom locked
R199 "RES1206 1k 1%" R1206#1 -16,-11.5 r90 bottom locked
R200 "RES1206 1k 1%" R1206#1 -18.3,-11.5 r90 bottom locked
R201 "RES1206 12K 1%" R1206#1 -11.7,-28.3 r270 bottom
R202 "RES1206 12K 1%" R1206#1 -14,-28.3 r270 bottom
R203 "RES1206 100R 1%" R1206#1 -11.4,-11.5 r270 bottom locked
R204 "RES1206 12K 1%" R1206#1 -13.7,-11.5 r90 bottom locked
R205 "RES1206 12K 1%" R1206#2 -22.2,-23.2 r180 top locked
R206 "RES1206 1R 1%" R1206#2 -22.2,-21 r0 top locked
R207 "RES1206 4.7K 1%" R1206#1 -20.9,-28.3 r270 bottom locked
R208 "RES1206 4.7K 1%" R1206#1 -23.2,-28.3 r270 bottom locked
R209 "RES1206 4.7K 1%" R1206#1 -22,-8.1 r180 bottom
R210 "RES1206 4.7K 1%" R1206#1 -22,-10.4 r180 bottom
R211 "RES1206 4.7K 1%" R1206#1 -35.2,-16.8 r180 bottom
R212 "RES1206 4.7K 1%" R1206#1 -35.6,0.5 r90 bottom
R213 "RES1206 4.7K 1%" R1206#2 -71.9,-13.7 r0 top locked
R214 "RES1206 4.7K 1%" R1206#2 -62.5,-32.8 r0 top locked
R215 "RES1206 4.7K 1%" R1206#2 -71.9,-8 r0 top locked
R216 "RES1206 4.7K 1%" R1206#2 -71.9,-5.7 r0 top locked
R217 "RES1206 4.7K 1%" R1206#2 -71.9,0 r0 top locked
R218 "RES1206 2.2K 1%" R1206#2 -76.3,39.7 r270 top
R219 "RES1206 560R 1%" R1206#2 -73.7,15.7 r90 top
R220 "RES1206 180R 1%" R1206#2 -59.5,-2.8 r180 top
R221 "RES1206 100k 1%" R1206#1 -57.9,19 r0 bottom
R222 "RES1206 100K 1%" R1206#1 -67.8,18.9 r0 bottom
RAMON1 "WWW.RAMONIC.COM" PCBComponent_1 -45.8,5.3 r0 top
RAMON2 "WWW.RAMONIC.COM" PCBComponent_1 -41.7,22.5 r180 bottom
U1 "ZXMP10A13FTA" SOT95P230X110-3N -19.9,27.6 r0 top locked
U2 "INA180A1IDBVR" SOT95P280X145-5N -13.2,18.2 r180 top locked
U3 "ZXMP10A13FTA" SOT95P230X110-3N -5.4,27.6 r0 top locked
U4 "INA180A1IDBVR" SOT95P280X145-5N 1.3,18.2 r180 top locked
U5 "ZXMP10A13FTA" SOT95P230X110-3N 9.1,27.6 r0 top locked
U6 "INA180A1IDBVR" SOT95P280X145-5N 15.8,18.2 r180 top locked
U7 "ZXMP10A13FTA" SOT95P230X110-3N 23.6,27.6 r0 top locked
U8 "INA180A1IDBVR" SOT95P280X145-5N 30.3,18.2 r180 top locked
U9 "ZXMP10A13FTA" SOT95P230X110-3N 38.1,27.6 r0 top locked
U10 "INA180A1IDBVR" SOT95P280X145-5N 44.8,18.2 r180 top locked
U11 "ZXMP10A13FTA" SOT95P230X110-3N 52.6,27.6 r0 top locked
U12 "INA180A1IDBVR" SOT95P280X145-5N 59.3,18.2 r180 top locked
U13 "ZXMP10A13FTA" SOT95P230X110-3N 67.1,27.6 r0 top locked
U14 "INA180A1IDBVR" SOT95P280X145-5N 73.8,18.2 r180 top locked
U15 "ZXMP10A13FTA" SOT95P230X110-3N 71.5,-27.5 r180 top locked
U16 "INA180A1IDBVR" SOT95P280X145-5N 64.8,-18.1 r0 top locked
U17 "ZXMP10A13FTA" SOT95P230X110-3N 57,-27.5 r180 top locked
U18 "INA180A1IDBVR" SOT95P280X145-5N 50.3,-18.1 r0 top locked
U19 "ZXMP10A13FTA" SOT95P230X110-3N 42.5,-27.5 r180 top locked
U20 "INA180A1IDBVR" SOT95P280X145-5N 35.8,-18.1 r0 top locked
U21 "ZXMP10A13FTA" SOT95P230X110-3N 28,-27.5 r180 top locked
U22 "INA180A1IDBVR" SOT95P280X145-5N 21.3,-18.1 r0 top locked
U23 "ZXMP10A13FTA" SOT95P230X110-3N 13.5,-27.5 r180 top locked
U24 "INA180A1IDBVR" SOT95P280X145-5N 6.8,-18.1 r0 top locked
U25 "ZXMP10A13FTA" SOT95P230X110-3N -1,-27.5 r180 top locked
U26 "INA180A1IDBVR" SOT95P280X145-5N -7.7,-18.1 r0 top locked
U27 "ZXMP10A13FTA" SOT95P230X110-3N -15.5,-27.5 r180 top locked
U28 "INA180A1IDBVR" SOT95P280X145-5N -22.2,-18.1 r0 top locked
U29 "STM32F407VGT6" STM-LQFP100_N -48.3,-16 r270 bottom locked
U30 "LMR33630ADDAR" FP-DDA0008J-IPC_C -63.9,15.2 r0 bottom
U31 "TLV76133DCYR" VREG_TLV76133DCYR -60.399,5.649 r270 top
U32 "NUP2105LT1G" PRKT-SOT23-3_V -57.2,29.2 r180 top
U33 "NUP2105LT1G" PRKT-SOT23-3_V -42,29.2 r180 top
X1 "XTL_8MHz" XTL_2_11X5 -48.55,-0.7 r180 bottom locked

## Footprints (in the part's own frame and the unit in brackets; to place one, negate y for a bottom-side part, rotate by r counter-clockwise, add the part's x,y. Pads: shape width x height; smd on the part's side, far side on the other; paste and mask are expansions set on the pad)
ATXPWR_2 [mm] "Connector; ATX Power; 2 Position, Molex 39281023"
  rect 3x3 hole 1.8 mask-2539.97: 1(0,2.5) 2(0,-2.5)
  silkscreen extent -2.8,-6.1 2.8,5, body extent -3.1,-6 3.1,5, height 12.8
ATXPWR_6 [mm] "Connector; ATX Power; 6 Position, TE 4-1775099-1"
  rect 3x3 hole 1.8 mask-2539.97: 1(-4.2,2.5) 2(0,2.5) 3(4.2,2.5) 4(-4.2,-3) 5(0,-3) 6(4.2,-3)
  silkscreen extent -7,-6.1 7,5, body extent -6.85,-6.1 6.85,4.8, height 13
C0805 [mm] "CHIP Capacitor, 2.0X1.3mm, 0805"
  rrect50% 1x1.2 smd mask-2539.97: 1(-1,0) 2(1,0)
  Top Layer pour cut-out: -0.5,0.8 0.5,0.8 0.5,-0.8 -0.5,-0.8
  silkscreen extent -1.7,-0.8 1.7,0.8, body extent -1,-0.62 1,0.63, height 1
C1206#1 [mm] "CHIP Capacitor, 3.2X1.6mm, 1206"
  rrect50% 1.6x1.6 smd mask-2539.97: 1(-1.4,0) 2(1.4,0)
  Top Layer pour cut-out: -0.8,1 -0.8,-1 0.8,-1 0.8,1
  silkscreen extent -2.4,-1 2.4,1, body extent -1.6,-0.8 1.6,0.8, height 1
C1206#2 [mm] "CHIP Capacitor, 3.2X1.6mm, 1206"
  rrect50% 1.6x1.6 smd mask+0.075: 1(-1.4,0) 2(1.4,0)
  Top Layer pour cut-out: -0.8,1 -0.8,-1 0.8,-1 0.8,1
  silkscreen extent -2.4,-1 2.4,1, body extent -1.6,-0.8 1.6,0.8, height 1
C_EL_8X12 [mm] "Capacitor Electrolythic, D8.0X12.0H pitch: 3.5mm"
  rect 2x2 hole 1.1 mask-2539.97: 1(-1.7,0) 2(1.7,0)
  silkscreen extent -4.7,-4.1 4.1,4.1, body extent -4.03,-4.03 4.03,4.03, height 2.98
C_EL_10X16 [mm] "Capacitor Electrolythic, D10.0X16.0H pitch: 5.0mm"
  rect 2x2 hole 1.1 mask-2539.97: 1(-2.5,0) 2(2.5,0)
  silkscreen extent -5.9,-5.1 5.1,5.1, body extent -5,-5 5,5, height 16
C_TN_3528 [mm] "CAPACITOR, TAN B, TAN H, TAN T, TAN M, 3528P, 1210P, 3.5X2.8mm"
  rrect50% 1.6x2.2 smd mask-2539.97: 1(-1.6,0)
  rect 1.6x2.2 smd mask-2539.97: 2(1.6,0)
  Top Layer pour cut-out: -0.889,1.4 -0.889,-1.4 0.889,-1.4 0.889,1.4
  silkscreen extent -2.7,-1.4 1.8,1.4, body extent -1.85,-1.47 1.85,1.46, height 2.03
CAIS2062A [mm]
  rect 1.1x0.35 smd mask-2539.97: 1(-2.425,2.275) 2(-2.425,1.625) 3(-2.425,0.975) 4(-2.425,0.325) 5(-2.425,-0.325) 6(-2.425,-0.975) 7(-2.425,-1.625) 8(-2.425,-2.275) 9(2.425,-2.275) 10(2.425,-1.625) 11(2.425,-0.975) 12(2.425,-0.325) 13(2.425,0.325) 14(2.425,0.975) 15(2.425,1.625) 16(2.425,2.275)
  silkscreen extent -1.6,-2.6 1.6,2.6
D_SMA [mm] "SMA Molded Diode, 2-Leads, Body 4.3x2.7mm, SOD-128"
  rect 2.2x1.6 smd mask-2539.97: 1(-2.2,0)
  rrect50% 2.2x1.6 smd mask-2539.97: 2(2.2,0)
  silkscreen extent -2.4,-1.5 2.9,1.5, body extent -2.75,-1.4 2.75,1.4, height 2.6
D_SMB [mm] "SMB Molded Diode, 2-Leads, Body 4.3x3.5mm"
  rect 2.2x2.2 smd mask+0.102: 1(-2.1,0)
  rrect50% 2.2x2.2 smd mask+0.102: 2(2.1,0)
  Top Layer pour cut-out: -1.524,2.1 -1.524,-2.1 1.524,-2.1 1.524,2.1
  silkscreen extent -2.4,-2.1 3.2,2.1, body extent -2.75,-1.95 2.75,1.95, height 2.45
DIOM4325X250N [mm]
  rect 2.12x1.5 smd mask-2539.97: A(2.115,0) C(-2.115,0)
  silkscreen extent -4.1,-1.28 2.16,1.28, body extent -2.57,-1.28 2.57,1.28, height 2.5
FH_24101812 [mm] "FUSE HOLDER for 2410 and 1812 sizes"
  rrect30% 4.5x4 smd: 1(-3,0) 2(2.9,0)
  silkscreen extent -4.9,-2.6 4.9,2.6, body extent -5.1,-2.51 5.1,2.52, height 4.11
FP-ACM2520-2P-MFG [mm]
  rect 0.8x0.4 smd mask-2539.97: 1(-1.15,0.65) 2(-1.15,-0.65) 3(1.15,-0.65) 4(1.15,0.65)
  silkscreen extent -2.22,-1.1 0.38,1.1, body extent -1.65,-1.2 1.65,1.2, height 0.25
FP-DDA0008J-IPC_C [mm]
  rect 1.874x0.542 smd mask+0: 1(-2.316,1.905)
  rrect100% 1.874x0.542 smd mask+0: 2(-2.316,0.635) 3(-2.316,-0.635) 4(-2.316,-1.905) 5(2.316,-1.905) 6(2.316,-0.635) 7(2.316,0.635) 8(2.316,1.905)
  rect 2.3x3.1 smd mask+0: 9(0,0)
  silkscreen extent -3.97,-2.45 0.75,2.45, body extent -3,-2.45 3,2.45, height 1.7
IND_AMPLA7050S-100MT [mm]
  rect 2.95x3.5 smd mask+0.102: 1(-2.725,0) 2(2.725,0)
  silkscreen extent -3.65,-3.3 3.65,3.3, body extent -3.72,-3.3 3.72,3.3, height 4.8
JPH_3 [mm] "Jumper Header 2.54mm Pitch, 3PIN, Vertical"
  rect 2x2 hole 1.1 mask-2539.97: 1(-2.54,0) 2(0,0) 3(2.54,0)
  silkscreen extent -3.9,-1.4 3.9,1.4, body extent -3.82,-1.27 3.8,1.27, height 8.57
LED1206GRN#1 [mm] "LED, 1206, GREEN"
  rect 1x1.6 smd mask-2539.97: 1(-1.4,0)
  rrect50% 1x1.6 smd mask-2539.97: 2(1.4,0)
  Top Layer pour cut-out: -1.1,1.1 -1.1,-1.1 1.1,-1.1 1.1,1.1
  silkscreen extent -2.1,-1 2.3,1, body extent -1.6,-0.8 1.6,0.8, height 0.68
LED1206GRN#2 [mm] "LED, 1206, GREEN"
  rect 1x1.6 smd mask-2539.97: 1(-1.4,0)
  rrect50% 1x1.6 smd mask-2539.97: 2(1.4,0)
  silkscreen extent -2.1,-1 2.3,1, body extent -1.6,-0.8 1.6,0.8, height 0.68
PCBComponent_1 [mm]
  silkscreen extent -5.35,-4.64 5.33,4.64
PRKT-SOT23-3_V [mm] "SOT23, 3-Leads, Body 2.92x1.3mm, Pitch 0.94mm"
  rect 0.84x0.84 smd mask-2539.97: 1(-1,0.94) 3(1,0)
  rect 0.84x0.9 smd mask-2539.97: 2(-1,-0.94)
  silkscreen extent -2.09,-1.46 0.65,1.46, body extent -0.65,-1.46 0.65,1.46, height 1.17
R0805 [mm] "CHIP RESISTOR 1/8 WATT ,2.0X1.3mm, 0805, 2012"
  rrect50% 1x1.2 smd mask-2539.97: 1(-1,0) 2(1,0)
  Top Layer pour cut-out: -0.5,0.8 0.5,0.8 0.5,-0.8 -0.5,-0.8
  silkscreen extent -1.7,-0.8 1.7,0.8, body extent -1.15,-0.67 1.15,0.68, height 0.76
R1206#1 [mm] "CHIP RESISTOR 1/4 WATT, Body 3.2x1.6mm,1206, 3216"
  rrect50% 1.6x1.6 smd mask+0.075: 1(-1.4,0) 2(1.4,0)
  Top Layer pour cut-out: -0.8,1 -0.8,-1 0.8,-1 0.8,1
  silkscreen extent -2.4,-1 2.4,1, body extent -1.68,-0.86 1.68,0.86, height 0.85
R1206#2 [mm] "CHIP RESISTOR 1/4 WATT, Body 3.2x1.6mm,1206, 3216"
  rrect50% 1.6x1.6 smd mask-2539.97: 1(-1.4,0) 2(1.4,0)
  Top Layer pour cut-out: -0.8,1 -0.8,-1 0.8,-1 0.8,1
  silkscreen extent -2.4,-1 2.4,1, body extent -1.67,-0.86 1.68,0.87, height 0.85
SOIC254P1030X460-4N [mm]
  rrect25% 1.41x1.47 smd mask+0.102: 1(-4.85,1.27) 2(-4.85,-1.27) 3(4.85,-1.27) 4(4.85,1.27)
  silkscreen extent -6.35,-2.44 3.4,2.44, body extent -3.94,-2.29 3.94,2.29, height 7.8
SOT95P230X110-3N [mil]
  rect 46x22 smd mask-99999: 1(-43,37) 2(-43,-37) 3(43,0)
  silkscreen extent -14,-60 28,60, body extent -47,-57 47,57, height 45
SOT95P240X111-3N [mm]
  rrect25% 1.23x0.6 smd mask+0.102: 1(-1.06,0.95) 2(-1.06,-0.95) 3(1.06,0)
  silkscreen extent -2.6,-1.46 0.65,1.46
SOT95P280X145-5N [mm]
  rrect50% 1.21x0.59 smd mask-2539.97: 1(-1.255,0.95) 2(-1.255,0) 3(-1.255,-0.95) 4(1.255,-0.95) 5(1.255,0.95)
  silkscreen extent -2.51,-1.45 0.8,1.45, body extent -1.4,-1.45 1.4,1.45, height 1.45
STM-LQFP100_N [mm] "Thin QFP, 100-Leads, Body 14x14mm, Pitch 0.5mm, IPC Medium Density"
  oval 1.8x0.3 smd mask+0.102: 1(-7.55,6) 2(-7.55,5.5) 3(-7.55,5) 4(-7.55,4.5) 5(-7.55,4) 6(-7.55,3.5) 7(-7.55,3) 8(-7.55,2.5) 9(-7.55,2) 10(-7.55,1.5) 11(-7.55,1) 12(-7.55,0.5) 13(-7.55,0) 14(-7.55,-0.5) 15(-7.55,-1) 16(-7.55,-1.5) 17(-7.55,-2) 18(-7.55,-2.5) 19(-7.55,-3) 20(-7.55,-3.5) 21(-7.55,-4) 22(-7.55,-4.5) 23(-7.55,-5) 24(-7.55,-5.5) 25(-7.55,-6) 51(7.55,-6) 52(7.55,-5.5) 53(7.55,-5) 54(7.55,-4.5) 55(7.55,-4) 56(7.55,-3.5) 57(7.55,-3) 58(7.55,-2.5) 59(7.55,-2) 60(7.55,-1.5) 61(7.55,-1) 62(7.55,-0.5) 63(7.55,0) 64(7.55,0.5) 65(7.55,1) 66(7.55,1.5) 67(7.55,2) 68(7.55,2.5) 69(7.55,3) 70(7.55,3.5) 71(7.55,4) 72(7.55,4.5) 73(7.55,5) 74(7.55,5.5) 75(7.55,6)
  oval 0.3x1.8 smd mask+0.102: 26(-6,-7.55) 27(-5.5,-7.55) 28(-5,-7.55) 29(-4.5,-7.55) 30(-4,-7.55) 31(-3.5,-7.55) 32(-3,-7.55) 33(-2.5,-7.55) 34(-2,-7.55) 35(-1.5,-7.55) 36(-1,-7.55) 37(-0.5,-7.55) 38(0,-7.55) 39(0.5,-7.55) 40(1,-7.55) 41(1.5,-7.55) 42(2,-7.55) 43(2.5,-7.55) 44(3,-7.55) 45(3.5,-7.55) 46(4,-7.55) 47(4.5,-7.55) 48(5,-7.55) 49(5.5,-7.55) 50(6,-7.55) 76(6,7.55) 77(5.5,7.55) 78(5,7.55) 79(4.5,7.55) 80(4,7.55) 81(3.5,7.55) 82(3,7.55) 83(2.5,7.55) 84(2,7.55) 85(1.5,7.55) 86(1,7.55) 87(0.5,7.55) 88(0,7.55) 89(-0.5,7.55) 90(-1,7.55) 91(-1.5,7.55) 92(-2,7.55) 93(-2.5,7.55) 94(-3,7.55) 95(-3.5,7.55) 96(-4,7.55) 97(-4.5,7.55) 98(-5,7.55) 99(-5.5,7.55) 100(-6,7.55)
  silkscreen extent -7.67,-6.25 6.25,6.82, body extent -7,-7 7,7, height 1.6
USBC_SMD_16_DX07S016JA1 [mm] "CONN, USB, Type C, DX07S016JA1, popular*"
  rrect50% 0.5x1 smd mask-2539.97: A1B12(3.1,0) A4B9(2.35,0) B1A12(-3.1,0) B4A9(-2.35,0)
  rrect50% 0.3x1 smd mask-2539.97: A5(1.25,0) A6(0.25,0) A7(-0.25,0) A8(-1.25,0) B5(-1.75,0) B6(-0.75,0) B7(0.75,0) B8(1.75,0)
  oval 1x2.4 hole 0.6 slot 1.8 at 90 deg: SH1(-4.3,4.3) SH2(4.3,4.3)
  oval 1x2 hole 0.6 slot 1.6 at 90 deg: SH3(-4.3,0.4) SH4(4.3,0.4)
  round 0.7 hole 0.7 unplated: ""(-2.99,1.12) ""(2.99,1.12)
  silkscreen extent -4.5,1.6 4.5,6.72, body extent -4.47,-0.2 4.47,6.7, height 3.18
VREG_TLV76133DCYR [mm]
  rect 2.15x0.95 smd mask-2539.97: 1(-2.9,2.3) 2(-2.9,0) 3(-2.9,-2.3)
  rect 2.15x3.25 smd mask-2539.97: 4(2.9,0)
  silkscreen extent -4.7,-3.25 1.75,3.25, body extent -3.5,-3.25 3.5,3.25, height 1.8
XH_4 [mm] "PW10-x-M, JST-BxB-XH-A pitch: 2.5mm, 3A/250v"
  rect 2x2 hole 1.1 mask-2539.97: 1(-3.75,0) 2(-1.25,0) 3(1.25,0) 4(3.75,0)
  silkscreen extent -6.4,-2.4 6.4,3.5, body extent -6.25,-2.3 6.25,3.4, height 7
XTL_2_11X5 [mm] "SMD crystal resonator, ABL, ABLS, HC-49, HC49 11X4.5MM"
  oval 3x1.5 smd mask+0.102: 1(-5.6,0) 2(5.6,0)
  silkscreen extent -5.7,-2.4 5.7,2.4, body extent -6.4,-2.41 6.4,2.41, height 4.3

## Part data
. J2 J5 J8 J11 J14 J17 J20 J23 J26 J29 J32 J35 J38 J41 J48: "CONN, ATX POWER, 6 P", PACKAGE=ATXPWR-6pin, MANF=TE, MANF_P#=4-1775099-1, MountType=THD, Part Type=Conn.
. .: library part CMP-08256-000009-1, "CMC 200MA 2LN 1KOHM SMD", Case/Package=1008, Current=200mA, DC Resistance (DCR)=900mR, Max Operating Temperature=85°C, Min Operating Temperature=-40°C, Package Quantity=1, Test Frequency=100MHz, Voltage Rating=20V, DC Current=200mA, Depth=2.2mm, Height=0.051inch, Impedance=1kR, Lead Free="Lead Free", Length=0.098inch, Max DC Current=200mA, Mount="Surface Mount", Number of Lines=2, Packaging="Tape and Reel", Series=ACM, Termination=SMD/SMT, Width=0.079inch
. . . .: library part RES_SMD_0805, "RESISTOR, SMD", ASSEMBLY=ASSEMBLY, DESC=DESCRIPTION, DIST#=MOUSER, MANF=-, MANF_P#=-, PARAM=-W, PARAM2=1%, PRICE="100= 0.5$"
. C74 C75 C76 C77 C81 C82 C83: library part CAP_SMD_MLCC_0805, "CAP, MLCC", ASSEMBLY=ASSEMBLY, MANF=-, MANF_P#=MANF_PART#, PARAM="-, -%", PARAM2=-V, PRICE="100= 1$"
. . R1 R2 R3 R4 R5 R6 R7 R8 R9 R10 R11 R12 R13 R14 R15 R16 R17 R18 R19 R20 R21 R22 R23 R24 R25 R26 R27 R28 R29 R30 R31 R32 R33 R34 R35 R36 R37 R38 R39 R40 R41 R42 R43 R44 R45 R46 R47 R48 R49 R50 R51 R52 R53 R54 R55 R56 R57 R58 R59 R60 R61 R62 R63 R64 R65 R66 R67 R68 R69 R70 R71 R72 R73 R74 R75 R76 R77 R78 R79 R80 R81 R82 R83 R84 R85 R86 R87 R88 R89 R90 R91 R92 R93 R94 R95 R96 R97 R98 R99 R100 R101 R102 R103 R104 R105 R106 R107 R108 R109 R110 R111 R112 R113 R114 R115 R116 R117 R118 R119 R120 R121 R122 R123 R124 R125 R126 R127 R128 R129 R130 R131 R132 R133 R134 R135 R136 R137 R138 R139 R140 R141 R142 R143 R144 R145 R146 R147 R148 R149 R150 R151 R152 R153 R154 R155 R156 R157 R158 R159 R160 R161 R162 R163 R164 R165 R166 R167 R168 R169 R170 R171 R172 R173 R174 R175 R176 R177 R178 R179 R180 R181 R182 R183 R184 R185 R186 R187 R188 R189 R190 R191 R192 R193 R194 R195 R196 R197 R198 R199 R200 R201 R202 R203 R204 R205 R206 R207 R208 R209 R210 R211 R212 R213 R214 R215 R216 R217 R218 R219 R220 R221 R222: library part RES_SMD_1206, "RESISTOR, SMD", ASSEMBLY=ASSEMBLY, DESC=DESCRIPTION, DIST#=MOUSER, MANF=-, MANF_P#=-, PARAM="1%, 0.25W", PARAM2=-, PRICE=-
B1 B2: "LGA-16(4.7x5.2) Isolated CAN Transceivers (with Power) ROHS", Manufacturer_Name=ChipAnalog, Datasheet Link=https://e.chipanalog.com/Public/Uploads/uploadfile/files/20250325/CAIS2062AdatasheetVersion1.01en20250325.pdf, Geometry.Height=1.09mm, Manufacturer_Part_Number=CA-IS2062A
C1 C2 C3 C4 C5 C6 C7 C8 C9 C10 C11 C12 C13 C14 C15 C16 C17 C18 C19 C20 C21 C22 C23 C24 C25 C26 C27 C28 C29 C30 C31 C32 C33 C34 C35 C36 C37 C38 C39 C40 C41 C42 C43 C44 C45 C46 C47 C48 C49 C50 C51 C52 C53 C54 C55 C57 C58 C59 C60 C61 C62 C63 C64 C65 C67 C69 C71 C72 C73 C78 C79 C80: library part CAP_SMD_MLCC_1206, "CAP, MLCC", ASSEMBLY=ASSEMBLY, MANF=-, MANF_P#=MANF_PART#, PARAM="-, -%", PARAM2=-V, PRICE="100= 1$"
C56: library part CAP_THD_EL_470uF_35v, "CAP, THD, ELEC,", ASSEMBLY=ASSEMBLY, DESC=DESCRIPTION, DIST#=MOUSER, MANF=MANF, MANF_P#=MANF_PART#, PARAM=20%, PARAM2=35v, PRICE="10= -$"
C66: library part CAP_THD_EL_100uF_50v, "CAP, THD, ELEC,", ASSEMBLY=ASSEMBLY, DESC=DESCRIPTION, DIST#=MOUSER, MANF=MANF, MANF_P#=MANF_PART#, PARAM=20%, PARAM2=50v, PRICE="10= -$"
C68: library part CAP_SMD_TAN, "CAP, SMD, TAN", MANF=VISHAY, MANF_P#=T55A106M6R3C0300, PARAM="20%, 300mOhm, -55~105oC", PARAM2=6.3V, PRICE=0.46$
D1 D4 D7 D10 D13 D16 D19 D22 D25 D28 D31 D34 D37 D40 D46 D47 D48: library part LED_SMD_1206_GRN, "LED, SMD, 1206, GREEN", ASSEMBLY=ASSEMBLY, DESC=DESCRIPTION, MANF=-, MANF_P#=-, MountType=SMT, PARAM=20mA, PARAM2=2.2V, PartType=LED, PRICE=36t@Javan
D2 D3 D5 D6 D8 D9 D11 D12 D14 D15 D17 D18 D20 D21 D23 D24 D26 D27 D29 D30 D32 D33 D35 D36 D38 D39 D41 D42: library part SS14, "1A, 40V, Schottky Rectifier", PACKAGE="SMA-2 Taiwan Semiconductor", Check_prices=https://www.snapeda.com/parts/SS14/taiwan/view-part/?ref=eda, MF="Taiwan Semiconductor", MP=SS14, SnapEDA_Link=https://www.snapeda.com/parts/SS14/taiwan/view-part/?ref=snap
D43 D44: library part DIODE_SMD_SCHOTTKY_SS34, "DIODE, SCHOTTKY, 20V, 3A", ASSEMBLY=ASSEMBLY, DESC=DESCRIPTION, MANF=VISHAY, PARAM=20V, PARAM2=3A, PRICE=PRICE
  D44: MANF_P#=SS34
D45: library part DIODE_SMD_SCHOTTKY_SS34, "DIODE,TVS, 24V, 15A", ASSEMBLY=ASSEMBLY, DESC=DESCRIPTION, MANF=VISHAY, MANF_P#=SS34, PARAM=20V, PARAM2=3A, PRICE=PRICE
D49: library part DIODE_SMD_SCHOTTKY_B345A, "DIODE, SCHOTTKY, 40V, 3A", ASSEMBLY=ASSEMBLY, DESC=DESCRIPTION, MANF=DIODES, MANF_P#=B345AE-13, PARAM="3A, -50~150oC", PARAM2="45Vrrm, 0.45Vf", PRICE=0.35$
FH1: library part FUSE_SMD_HOLDER_24101812, "Fuse SMD2410 Holder", PACKAGE=SMD,5.0x9.7mm, MANF=Littelfuse, MANF_P#=01550900M, PARAM="max. 10A", PARAM2=125v, PRICE=0.2$
FUSE_SMD1: library part RES_SMD_1206, "resetable fuse", ASSEMBLY=ASSEMBLY, DESC=DESCRIPTION, DIST#=MOUSER, MANF=-, MANF_P#=-, PARAM="1%, 0.25W", PARAM2=-, PRICE=-
J1 J3 J4 J6 J7 J9 J10 J12 J13 J15 J16 J18 J19 J21 J22 J24 J25 J27 J28 J30 J31 J33 J34 J36 J37 J39 J40 J42: "Optoisolator Transistor Output 5000Vrms 1 Channel 4-SMD", PACKAGE="SMD-4 Everlight Electronics Co Ltd", Check_prices=https://www.snapeda.com/parts/EL817S/Everlight+Electronics+Co+Ltd/view-part/?ref=eda, MF="Everlight Electronics", MP=EL817S, SnapEDA_Link=https://www.snapeda.com/parts/EL817S/Everlight+Electronics+Co+Ltd/view-part/?ref=snap
J43 J44 J45: "PW10-x-M, JST-BxB-XH-A pitch: 2.5mm, 3A/250v", MANF=JST, MANF_P#=B4B-XH-A, PARAM=3.0A, PARAM2=250v
J46: library part CONN_USBC_SMD_16_DX07S016JA1, "CONN, USB, Type C, USB 2.0, Right-Angle, SMD", MANF=JAE, MANF_P#=DX07S016JA1R1500, PARAM=5A, PRICE=1.5$
JP1 JP2: library part JUMPER_HDR_3P, "JUMPER, HEADER 3PIN", MANF=MANF, MANF_P#=MANF_P#
L1: library part AMPLA7050S-100MT, "Inductor Power Shielded/Molded Wirewound 10uH 20% 100KHz Carbonyl Powder 4A 0.069Ohm DCR T/R", PACKAGE=Package, Availability="In Stock", Check_prices=https://www.snapeda.com/parts/AMPLA7050S-100MT/Abracon/view-part/?ref=eda, MF="Abracon Corporation", MP=AMPLA7050S-100MT, PRICE=None, Purchase-URL=https://pricing.snapeda.com/search/part/AMPLA7050S-100MT/?ref=eda, SnapEDA_Link=https://www.snapeda.com/parts/AMPLA7050S-100MT/Abracon/view-part/?ref=snap
POWER1: "CONN, ATX POWER, 2 P", PACKAGE=ATXPWR-2pin, MANF=Molex, MANF_P#=39281023, MountType=THD, Part Type=Conn.
Q1 Q2 Q3 Q4 Q5 Q6 Q7 Q8 Q9 Q10 Q11 Q12 Q13 Q14: "N-Channel 60V 280mA (Ta) 350mW (Ta) Surface Mount SOT-23-3 (TO-236)", PACKAGE=None, Availability=Unavailable, MF="{'manufacturer': u'onsemi'}", MP=2N7002, PRICE=None
RAMON1 RAMON2: library part RamonLogo
U1 U3 U5 U7 U9 U11 U13 U15 U17 U19 U21 U23 U25 U27: "P-Channel 100 V 600mA (Ta) 625mW (Ta) Surface Mount SOT-23-3", PACKAGE="SOT-23-3 Diodes Inc.", Availability="In Stock", Check_prices=https://www.snapeda.com/parts/ZXMP10A13FTA/Diodes+Inc./view-part/?ref=eda, MF="Diodes Inc.", MP=ZXMP10A13FTA, PRICE=None, Purchase-URL=https://pricing.snapeda.com/search/part/ZXMP10A13FTA/?ref=eda, SnapEDA_Link=https://www.snapeda.com/parts/ZXMP10A13FTA/Diodes+Inc./view-part/?ref=snap
U2 U4 U6 U8 U10 U12 U14 U16 U18 U20 U22 U24 U26 U28: "26V, 350kHz current sense amplifier", PACKAGE="SOT-23-5 Texas Instruments", Check_prices=https://www.snapeda.com/parts/INA180A1IDBVR/Texas+Instruments/view-part/?ref=eda, MF="Texas Instruments", MP=INA180A1IDBVR, SnapEDA_Link=https://www.snapeda.com/parts/INA180A1IDBVR/Texas+Instruments/view-part/?ref=snap